# Altium PCB AVP32F069_EVM_Rev1.1_220623.PcbDoc (part 2 of 2)
Units mm, origin at the board's own origin, x right, y up, seen from the top; angles counter-clockwise.
Board outline 130.01 x 88 mm, 4 copper layers (Top Layer, GND, S1, Bottom Layer), stack 2.642 mm thick; 134 components, 131 nets, 561 pads, 238 vias.
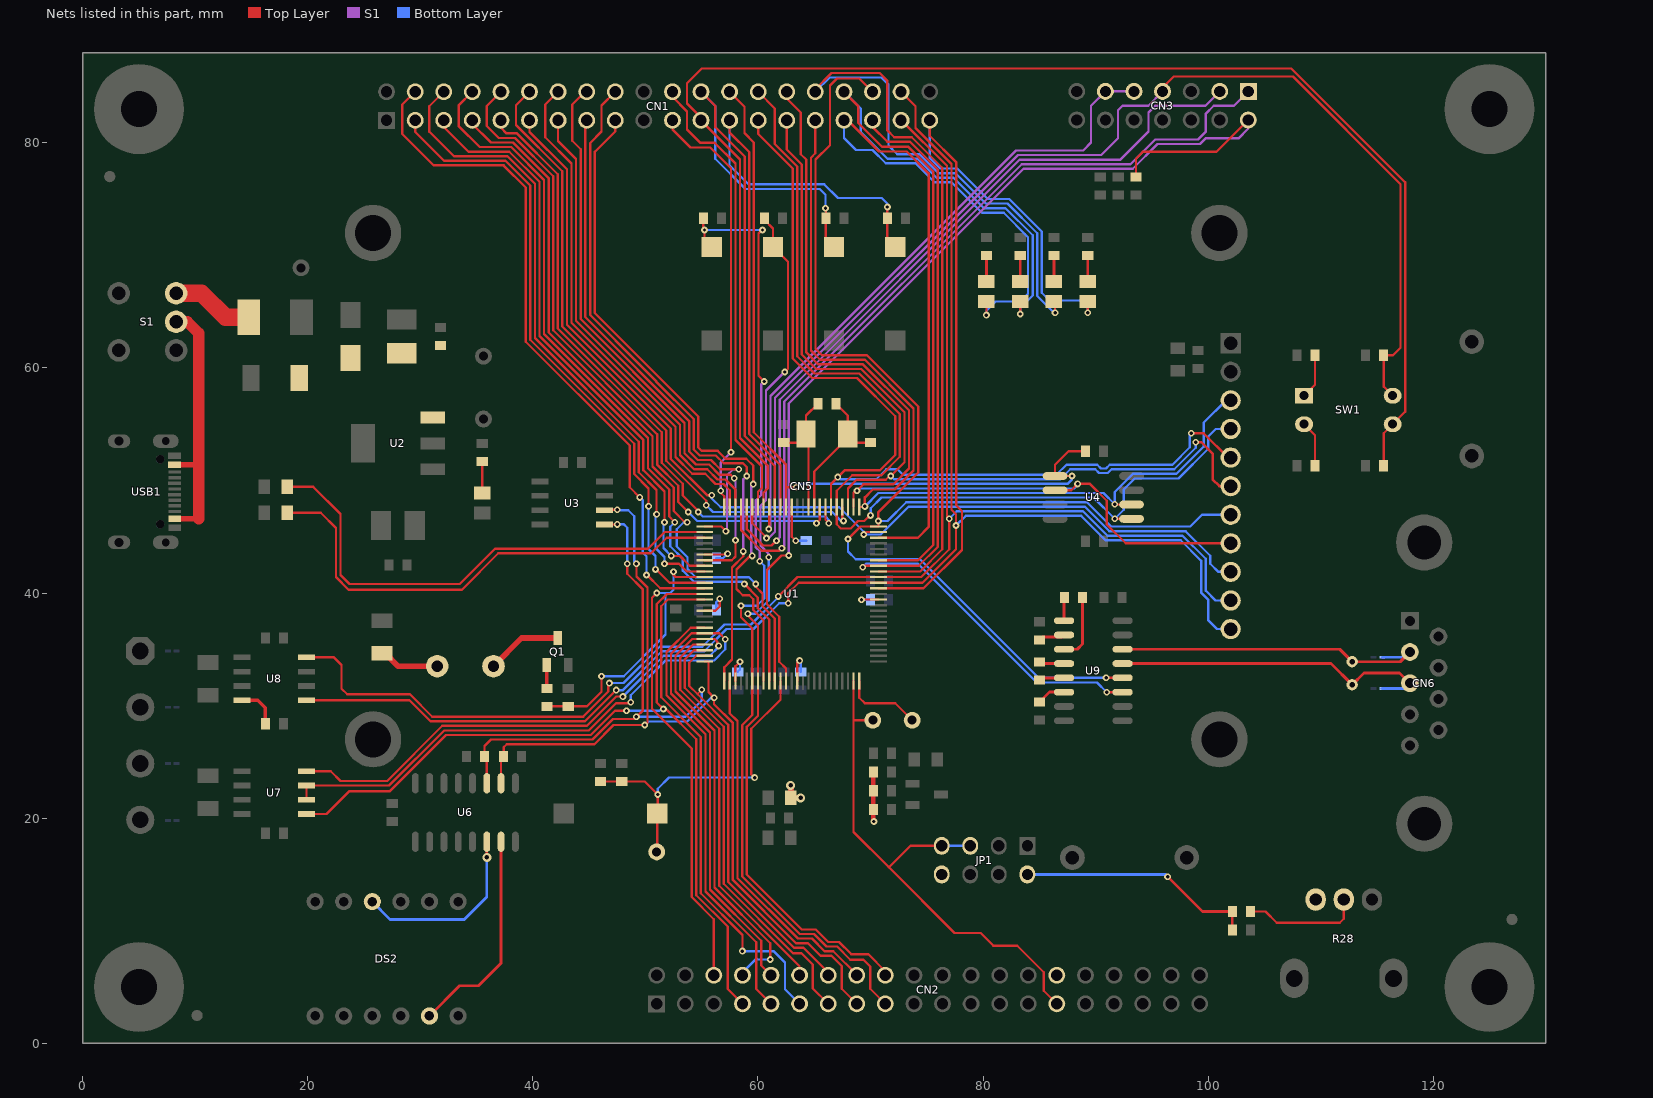
[diagram p4: the nets of this part, all layers, seen from the top]

## Via types
v1: diameter 0.6, hole 0.3, Top Layer to Bottom Layer, tented both sides, 170 vias
v2: diameter 0.8, hole 0.4, Top Layer to Bottom Layer, tented both sides, 64 vias
v3: diameter 1.27, hole 0.711, Top Layer to Bottom Layer, tented both sides, 4 vias

## Nets (pads, with @x,y where several pads share a name; then routed paths per layer and width w, separated by ;. In a path a pad name is that pad's centre, name@x,y a point inside that pad or via, vN(x,y) a via of type N, cw(c..) or ccw(c..) an arc to the next point about the centre after c; other vN are vias at no path point) (continued)
EPWM1A: CN1.4 U1.87 | length 61.7
  Top Layer w0.203: CN1.4@29.54,84.54 28.4,83.4 28.4,80.8 31.2,78 37.4,78 39.366,76.034 39.366,62.334 48.6,53.1 48.6,49.4 v1(49.503,48.497) ; v1(50.1,41.6) 50.148,41.6 51.319,40.429 55.258,40.429 U1.87@55.269,40.418
  Bottom Layer w0.203: v1(49.503,48.497) 49.753,48.247 49.753,43.608 50.1,43.261 v1(50.1,41.6)
EPWM1B: CN1.3 U1.86 | length 56.8
  Top Layer w0.203: CN1.3@29.54,82 29.54,80.96 32.094,78.406 37.568,78.406 39.772,76.202 39.772,62.502 49.006,53.268 49.006,50.575 50.281,49.3 v1(50.281,47.719) ; v1(50.9,42.1) 50.957,42.1 52.139,40.918 U1.86@55.269,40.918
  Bottom Layer w0.203: v1(50.281,47.719) 50.281,43.919 50.9,43.3 v1(50.9,42.1)
EPWM2A: CN1.6 U1.84 | length 57.8
  Top Layer w0.203: CN1.6@32.08,84.54 30.8,83.26 30.8,81 32.987,78.813 37.737,78.813 40.179,76.371 40.179,62.671 49.413,53.437 49.413,50.743 50.991,49.165 v1(50.991,47.009) ; v1(51.7,42.6) 52.984,42.6 53.666,41.918 U1.84@55.269,41.918
  Bottom Layer w0.203: v1(50.991,47.009) 50.9,46.919 50.9,44 51.7,43.2 v1(51.7,42.6)
EPWM2B: CN1.5 U1.83 | length 52.6
  Top Layer w0.203: CN1.5@32.08,82 32.08,81.42 34.281,79.219 37.905,79.219 40.585,76.539 40.585,62.839 49.819,53.605 49.819,50.912 51.7,49.031 v1(51.7,46.3) ; v1(52.3,43.3) 53.064,43.3 53.946,42.418 U1.83@55.269,42.418
  Bottom Layer w0.203: v1(51.7,46.3) 51.6,46.2 51.6,44 v1(52.3,43.3)
EPWM3A: CN1.8 U1.9 | length 68.8
  Top Layer w0.203: CN1.8@34.62,84.54 33.4,83.32 33.4,81.5 35.274,79.626 38.073,79.626 40.992,76.707 40.992,63.007 50.226,53.773 50.226,51.08 52.106,49.199 52.106,46.794 v1(52.6,46.3) ; v1(58.797,40.8) 59.987,39.61 59.987,38.658 60.994,37.652 U1.9@60.994,32.193
  Bottom Layer w0.203: v1(52.6,46.3) 52.2,45.9 52.2,44.148 53.328,43.019 53.328,41.972 54.306,40.994 58.603,40.994 v1(58.797,40.8)
EPWM3B: CN1.7 U1.10 | length 65.9
  Top Layer w0.203: CN1.7@34.62,82 34.62,81.68 36.268,80.032 38.242,80.032 41.398,76.876 41.398,63.176 50.632,53.942 50.632,51.248 52.513,49.367 52.513,47.287 53.5,46.3 v1(53.7,46.3) ; v1(59.8,40.8) 59.8,40.555 60.394,39.962 60.394,38.827 61.494,37.726 U1.10@61.494,32.193
  Bottom Layer w0.203: v1(53.7,46.3) 53.4,46.3 52.775,45.675 52.775,44.147 53.735,43.187 53.735,42.14 54.475,41.4 59.2,41.4 v1(59.8,40.8)
EPWM4A: CN1.10 U1.58 | length 59.5
  Top Layer w0.203: CN1.10@37.16,84.54 35.9,83.28 35.9,81.5 36.962,80.438 38.41,80.438 41.804,77.044 41.804,63.344 51.038,54.11 51.038,51.417 52.919,49.536 52.919,48.081 v1(53.8,47.2) ; v1(65.2,46.2) 65.494,46.494 U1.58@65.494,47.643
  Bottom Layer w0.203: v1(53.8,47.2) 54.606,46.394 65.006,46.394 v1(65.2,46.2)
EPWM4B: CN1.9 U1.57 | length 56.4
  Top Layer w0.203: CN1.9@37.16,82 37.16,81.34 37.655,80.845 38.578,80.845 42.211,77.212 42.211,63.512 51.445,54.278 51.445,51.585 53.326,49.704 53.326,48.674 54.7,47.3 v1(54.7,47.2) ; U1.57@65.994,47.643 65.994,46.506 v1(66.3,46.2)
  Bottom Layer w0.203: v1(54.7,47.2) 55.1,46.8 65.994,46.8 66.3,46.494 v1(66.3,46.2)
EPWM5A: CN1.12 U1.54 | length 58.3
  Top Layer w0.203: CN1.12@39.7,84.54 38.5,83.34 38.5,81.6 42.617,77.483 42.617,63.681 51.851,54.447 51.851,51.753 55.4,48.204 v1(55.4,47.8) ; U1.54@67.494,47.643 67.494,46.518 v1(67.6,46.412)
  Bottom Layer w0.203: v1(55.4,47.8) 55.994,47.206 66.594,47.206 67.388,46.412 v1(67.6,46.412)
EPWM5B/CS1: CN1.11 CN5.9 U1.49 | length 93.4
  Top Layer w0.203: CN1.11@39.7,82 39.7,80.975 43.024,77.651 43.024,63.849 52.258,54.615 52.258,51.922 55.479,48.7 v1(55.9,48.7) ; v1(69.4,45.2) 69.618,45.418 U1.49@70.719,45.418
  Bottom Layer w0.203: v1(55.9,48.7) 55.9,48.4 56.687,47.613 67.223,47.613 69.4,45.436 v1(69.4,45.2) 70.9,45.2 73.368,47.668 89.057,47.668 91.225,45.5 98,45.5 100.191,43.309 100.191,42.6 100.911,41.88 CN5.9@102,41.88
EPWM6A: CN1.14 U1.74 | length 45.3
  Top Layer w0.203: CN1.14@42.24,84.54 41.1,83.4 41.1,80.5 43.43,78.17 43.43,64.017 52.664,54.783 52.664,52.09 54.154,50.6 55.325,50.6 56.238,49.687 56.938,49.687 57.494,49.131 U1.74@57.494,47.643
EPWM6B: CN1.13 U1.73 | length 42
  Top Layer w0.203: CN1.13@42.24,82 42.24,80.16 43.836,78.564 43.836,64.186 53.07,54.952 53.07,52.258 54.322,51.006 55.494,51.006 56.406,50.094 57.106,50.094 57.994,49.206 U1.73@57.994,47.643
EPWM7A: CN1.16 U1.82 | length 52.1
  Top Layer w0.203: CN1.16@44.78,84.54 44.64,84.54 43.5,83.4 43.5,80.186 44.243,79.443 44.243,64.354 53.477,55.12 53.477,52.427 54.491,51.413 55.662,51.413 56.575,50.5 57.587,50.5 v1(57.887,50.2) ; U1.82@55.269,42.918 57.675,42.918 58,43.243 v1(58,44.7)
  S1 w0.203: v1(57.887,50.2) 58,50.087 v1(58,44.7)
EPWM7B: CN1.15 U1.76 | length 46.7
  Top Layer w0.203: CN1.15@44.78,82 44.649,81.869 44.649,64.522 53.883,55.288 53.883,52.595 54.659,51.819 55.83,51.819 56.649,51 v1(58.3,51) ; U1.76@55.269,45.918 56.732,45.918 v1(57.15,45.5)
  S1 w0.203: v1(57.15,45.5) 57.257,45.607 57.257,50.457 57.8,51 v1(58.3,51)
EPWM8A: CN1.18 U1.1 | length 61.7
  Top Layer w0.203: CN1.18@47.32,84.54 46.1,83.32 46.1,81 45.094,79.994 45.094,64.706 49.573,60.227 50.95,58.85 50.95,58.796 54.29,55.457 54.29,52.763 54.827,52.226 56.256,52.226 56.953,51.529 58.671,51.529 59,51.2 v1(59,50.4) ; U1.1@56.994,32.193 56.994,33.394 57.694,34.094 57.694,42.268 58.7,43.275 v1(58.7,43.7)
  S1 w0.203: v1(58.7,43.7) 58.7,50.1 v1(59,50.4)
EPWM8B: CN1.17 U1.8 | length 60.5
  Top Layer w0.203: CN1.17@47.32,82 47.32,81.02 45.5,79.2 45.5,64.875 54.696,55.679 54.696,52.932 54.996,52.632 56.424,52.632 57.121,51.935 58.965,51.935 59.592,51.308 59.588,51.304 v1(59.588,49.682) ; v1(59.5,43.3) 59.3,43.3 58.1,42.1 58.1,40.35 58.649,39.802 59.22,39.802 59.581,39.441 59.581,38.49 60.494,37.577 U1.8@60.494,32.193
  S1 w0.203: v1(59.5,43.3) 59.406,43.393 59.406,49.5 v1(59.588,49.682)
F: DS2.f U6.14 | length 16.6
  Top Layer w0.254: v2(35.905,16.505) U6.14@35.905,17.9
  Bottom Layer w0.254: DS2.f@25.73,12.58 27.31,11 33.9,11 35.905,13.005 v2(35.905,16.505)
G: DS2.g U6.15 | length 19.1
  Top Layer w0.254: DS2.g@30.81,2.42 33.49,5.1 35.175,5.1 37.175,7.1 U6.15@37.175,17.9
GPIO12/LED3: CN1.34 LD3.2 U1.44 | length 82.3
  Top Layer w0.203: CN1.34@67.64,84.54 68.9,83.28 68.9,81.788 71.044,79.644 73.384,79.644 75.57,77.458 75.57,44.27 75,43.7 74.218,42.918 U1.44@70.719,42.918 ; v1(83.3,64.8) LD3.2@83.3,65.925
  Bottom Layer w0.203: CN1.34@67.64,84.54 69.125,83.055 69.125,80.988 71.52,78.594 74.176,78.594 75.863,76.906 77.368,76.906 80.075,74.2 82,74.2 84.406,71.794 84.406,66.432 83.3,65.325 v1(83.3,64.8) v1@83.4,64.8
GPIO13: CN2.10 U1.95 U7.2 U7.3 | length 83.1
  Top Layer w0.203: U7.2@19.88,21.627 U7.3@19.88,22.897 27.223,22.897 32.119,27.794 44.968,27.794 47.387,30.213 48.7,30.213 v1(48.7,30.3) v1@48.9,30.3 ; v1(57.1,35.9) 56.582,36.418 U1.95@55.269,36.418 54.094,36.418 52.274,34.599 52.274,31.077 55.739,27.612 55.739,13.656 60.3,9.095 60.3,6.9 CN2.10@61.16,6.04
  Bottom Layer w0.203: v1(48.7,30.3) 48.7,30.925 51.786,34.012 56.112,34.012 57.1,35 v1(57.1,35.9)
GPIO14/SCITXDB: CN2.8 U1.96 U7.4 | length 80.7
  Top Layer w0.203: U7.4@19.88,24.167 22.033,24.167 22.896,23.304 27.054,23.304 31.951,28.2 44.8,28.2 47.4,30.8 v1(48,30.8) v1@48.1,30.9 ; v1(56.5,35.3) 56.382,35.418 56.382,35.7 56.164,35.918 U1.96@55.269,35.918 54.169,35.918 52.681,34.43 52.681,31.246 56.146,27.781 56.146,13.824 61.087,8.883 v1(61.087,7.442)
  Bottom Layer w0.203: v1(48,30.8) 51.618,34.418 55.718,34.418 56.5,35.2 v1(56.5,35.3) ; CN2.8@58.62,6.04 58.62,6.271 59.871,7.522 59.951,7.442 v1(61.087,7.442)
GPIO15/SCIRXDB: CN2.7 U1.88 U7.1 | length 79.1
  Top Layer w0.203: U7.1@19.88,20.357 21.657,20.357 23.7,22.4 27.3,22.4 32.287,27.387 45.137,27.387 47.299,29.55 v1(48.314,29.55) ; U1.88@55.269,39.918 51.918,39.918 50.994,38.994 50.994,30.306 v1(51.6,29.7) 51.825,29.7 54.52,27.005 54.52,13.151 57.308,10.363 57.308,4.812 CN2.7@58.62,3.5
  Bottom Layer w0.203: v1(48.314,29.55) 51.25,29.55 51.5,29.8 v1(51.6,29.7)
GPIO16/SPIA_SIMO: CN1.28 CN5.4 U1.55 U4.5 | length 93.7
  Top Layer w0.203: CN1.28@60.02,84.54 61.5,83.06 61.5,79.9 63.49,77.91 63.49,61.037 65.02,59.506 69.004,59.506 72.606,55.904 72.606,52.106 70.968,50.468 68.368,50.468 66.994,49.094 U1.55@66.994,47.643 66.994,46.106 67.356,45.744 68.244,45.744 68.9,46.4 69.451,46.4 69.951,46.9 v1(70,46.9) ; v1(91.7,46.6) 91.705,46.595 U4.5@93.2,46.595
  Bottom Layer w0.203: v1(70,46.9) 70.029,46.929 70.029,47.529 70.981,48.481 89.819,48.481 v1(91.7,46.6) 92.5,47.4 92.5,49.2 93.487,50.187 97.362,50.187 100.006,52.832 100.006,53.906 100.68,54.58 CN5.4@102,54.58
GPIO17/SPIA_SOMI: CN1.30 CN5.8 U1.52 U4.2 | length 86.7
  Top Layer w0.203: CN1.30@62.56,84.54 62.56,83.94 63.8,82.7 63.8,79 64.303,78.497 64.303,61.374 65.357,60.319 69.341,60.319 73.419,56.241 73.419,51.059 72.016,49.655 69.355,49.655 v1(68.8,49.1) 68.7,49.1 68.494,48.894 U1.52@68.494,47.643 ; U4.2@86.4,49.135 87.835,49.135 v1(88.4,49.7) 89.5,49.7 91,48.2 91,46.1 92.68,44.42 CN5.8@102,44.42
  Bottom Layer w0.203: v1(68.8,49.1) 68.994,49.294 88.094,49.294 88.5,49.7 v1(88.4,49.7)
GPIO18/SPIA_SCK: CN1.31 CN5.3 U1.51 U4.6 | length 84.6
  Top Layer w0.203: CN1.31@65.1,82 65.1,79.075 64.709,78.684 64.709,61.542 65.525,60.726 69.509,60.726 73.826,56.409 73.826,50.891 72.135,49.2 70.2,49.2 69.5,48.5 v1(69.5,47.7) 69.443,47.643 U1.51@68.994,47.643 ; v1(91.7,47.9) 91.735,47.865 U4.6@93.2,47.865
  Bottom Layer w0.203: v1(69.5,47.7) 70.687,48.887 90.713,48.887 v1(91.7,47.9) 91.7,48.975 93.319,50.594 97.194,50.594 99.6,53 99.6,55.125 101.595,57.12 CN5.3@102,57.12
GPIO19/SPIA_CSn: CN1.26 R14.2 U1.64 U4.1 | length 70.7
  Top Layer w0.203: CN1.26@57.48,84.54 58.8,83.22 58.8,80.872 59.632,80.04 59.632,54.292 62.494,51.43 62.494,49.4 ; U1.64@62.494,47.643 62.494,49.4 ; v1(63.4,49.4) 62.494,49.4 ; v1(87.9,50.4) 87.895,50.405 U4.1@86.4,50.405 86.4,51.4 87.6,52.6 R14.2@89.1,52.6
  Bottom Layer w0.203: v1(63.4,49.4) 63.7,49.7 87.5,49.7 87.9,50.1 v1(87.9,50.4)
GPIO20/KEY1: CN2.17 K1.1 R22.2 U1.6 | length 87.5
  Top Layer w0.203: R22.2@55.15,73.3 55.15,72.358 v1(55.245,72.263) 55.245,71.405 K1.1@55.9,70.75 ; v1(58.496,38.862) 58.496,37.846 59.494,36.848 U1.6@59.494,32.193 59.494,29.169 58.6,28.275 58.6,14.818 63.715,9.703 64.969,9.703 66.087,8.585 67.036,8.585 68.205,7.417 69.373,7.417 69.983,6.807 69.983,4.837 CN2.17@71.32,3.5 ; v1(60.401,72.263) 60.35,72.263 60.046,71.958 60.046,71.559 60.038,71.552 60.038,59.316 v1(60.554,58.801)
  S1 w0.203: v1(60.154,42.818) 60.154,43.707 59.813,44.048 59.813,48.238 60.303,48.729 60.303,58.551 v1(60.554,58.801)
  Bottom Layer w0.203: v1(55.245,72.263) v1(60.401,72.263) ; v1(58.496,38.862) 59.894,38.862 60.554,39.522 60.554,42.418 v1(60.154,42.818)
GPIO21/KEY2: CN2.18 K2.1 R24.2 U1.7 | length 78.7
  Top Layer w0.203: v1(59.106,38.151) 59.106,37.972 59.994,37.084 U1.7@59.994,32.193 59.994,29.094 59.006,28.106 59.006,14.986 63.884,10.109 65.138,10.109 66.247,9 67.197,9 68.301,7.895 69.825,7.895 71.32,6.4 CN2.18@71.32,6.04 ; R24.2@60.6,73.3 60.6,73.131 61.333,72.398 K2.1@61.333,70.75 61.371,70.75 62.677,69.444 62.677,59.934 v1(62.382,59.639)
  S1 w0.203: v1(60.96,43.18) 60.96,43.475 60.219,44.216 60.219,47.748 60.71,48.238 60.71,57.992 62.357,59.639 v1(62.382,59.639)
  Bottom Layer w0.203: v1(59.106,38.151) 59.758,38.151 60.96,39.353 v1(60.96,43.18)
GPIO22: CN2.13 U1.98 | length 38.4
  Top Layer w0.203: U1.98@55.269,34.918 54.318,34.918 53.494,34.094 53.494,31.582 56.958,28.117 56.958,14.161 63.118,8.001 63.861,8.001 64.877,6.985 64.877,4.863 CN2.13@66.24,3.5
GPIO23: CN2.16 U1.2 | length 32
  Top Layer w0.203: U1.2@57.494,32.193 57.494,29.306 58.178,28.622 58.178,14.666 63.547,9.296 64.801,9.296 65.919,8.179 66.697,8.179 68.78,6.095 CN2.16@68.78,6.04
GPIO24: CN2.12 U1.97 | length 35.3
  Top Layer w0.203: U1.97@55.269,35.418 54.243,35.418 53.087,34.262 53.087,31.414 56.552,27.949 56.552,13.992 63.7,6.844 CN2.12@63.7,6.04
GPIO25/LED1: CN1.39 LD1.2 U1.39 | length 75.8
  Top Layer w0.203: U1.39@70.719,40.418 74.718,40.418 78.129,43.829 78.129,47.271 77.606,47.794 77.606,78.296 75.26,80.642 CN1.39@75.26,82 ; v1(89.3,64.9) LD1.2@89.3,65.925
  Bottom Layer w0.203: CN1.39@75.26,82 75.26,78.659 76.2,77.719 77.705,77.719 80.411,75.013 82.337,75.013 85.219,72.13 85.219,66.681 85.9,66 88.8,66 89.3,65.5 v1(89.3,64.9)
GPIO26/USB0DP: R12.2 U1.78 | length 44.4
  Top Layer w0.203: R12.2@18.157,47.133 21.142,47.133 22.5,45.775 22.5,41.425 23.625,40.3 33.7,40.3 36.932,43.532 50.5,43.532 51.886,44.918 U1.78@55.269,44.918
GPIO27/USB0DN: R11.2 U1.77 | length 45.8
  Top Layer w0.203: R11.2@18.157,49.433 20.493,49.433 22.906,47.02 22.906,41.594 23.7,40.8 33.493,40.8 36.631,43.938 50.238,43.938 51.718,45.418 U1.77@55.269,45.418
GPIO28/SCIRXDA/BLK: CN1.36 CN5.7 U1.50 U9.12 | length 118.5
  Top Layer w0.203: v1(68,44.8) 69.118,45.918 U1.50@70.719,45.918 70.719,46.381 v1(70.7,46.4) 70.7,47.19 74.232,50.722 74.232,56.578 69.678,61.132 65.694,61.132 65.115,61.71 65.115,78.515 66.4,79.8 66.4,85.094 67.031,85.725 68.995,85.725 CN1.36@70.18,84.54 ; v1(90.935,32.465) U9.12@92.4,32.465
  Bottom Layer w0.203: v1(68,44.8) 68,43.7 68.694,43.006 74.394,43.006 84.935,32.465 v1(90.935,32.465) ; v1(70.7,46.4) 71.5,46.4 73.174,48.074 89.226,48.074 91.394,45.906 98.406,45.906 99.46,46.96 CN5.7@102,46.96
GPIO29/SCITXDA: CN1.35 U1.43 U9.11 | length 76.8
  Top Layer w0.203: v1(69.3,42.3) 69.418,42.418 U1.43@70.719,42.418 74.293,42.418 75.977,44.102 75.977,77.627 73.503,80.1 71.5,80.1 70.18,81.42 CN1.35@70.18,82 ; v1(90.995,31.195) U9.11@92.4,31.195
  Bottom Layer w0.203: v1(69.3,42.3) 69.6,42.6 74.225,42.6 84.767,32.059 90.131,32.059 v1(90.995,31.195)
GPIO30/CANRXA/CS2: CN1.37 CN5.10 U1.41 U8.4 | length 137.3
  Top Layer w0.203: U8.4@19.88,34.284 22.316,34.284 23,33.6 23,31.5 23.5,31 29.075,31 31.062,29.013 44.463,29.013 46.7,31.249 46.7,31.9 v1(46.8,32) ; v1(61.8,39.7) 63.518,41.418 74.518,41.418 77,43.9 v1(77,46.6) 76.789,46.811 76.789,77.963 72.753,82 CN1.37@72.72,82
  Bottom Layer w0.203: v1(46.8,32) 48.05,32 51.281,35.231 55.056,35.231 57.032,37.206 59.388,37.206 61.8,39.618 v1(61.8,39.7) v1@61.9,39.7 ; v1(77,46.6) 77.662,47.262 88.889,47.262 91.057,45.094 97.732,45.094 99.784,43.041 99.784,40.216 100.66,39.34 CN5.10@102,39.34
GPIO31/CANTXA/PEN: CN1.38 CN5.11 U1.40 U8.1 | length 139.7
  Top Layer w0.203: U8.1@19.88,30.474 29.026,30.474 30.894,28.606 44.632,28.606 v1(47.4,31.375) ; v1(62.7,39.1) 62.7,40 63.618,40.918 74.618,40.918 77.6,43.9 v1(77.6,46) 77.6,47 77.2,47.4 77.2,78.127 74,81.327 74,83.26 CN1.38@72.72,84.54
  Bottom Layer w0.203: v1(47.4,31.375) 48,31.375 51.45,34.824 55.224,34.824 57.2,36.8 59.6,36.8 61.9,39.1 v1(62.7,39.1) ; v1(77.6,46) 78.455,46.855 88.721,46.855 90.889,44.687 97.563,44.687 99.378,42.873 99.378,40.047 100,39.425 100,37.595 100.795,36.8 CN5.11@102,36.8
GPIO32/IIC_SDA: CN2.14 R17.1 U1.99 U3.5 U6.3 | length 80.6
  Top Layer w0.203: U6.3@35.905,23.1 35.905,25.271 R17.1@35.7,25.476 35.7,26.4 36.281,26.981 45.305,26.981 47.124,28.8 49,28.8 v1(49.2,29) 49.774,29.574 49.774,40.326 48.394,41.706 v1(48.394,42.606) ; U3.5@46.357,46.095 47.495,46.095 v1(47.5,46.1) ; v1(55,31.4) 54.651,31.051 54.651,31 ; U1.99@55.269,34.418 54.518,34.418 53.9,33.8 53.9,31.751 54.651,31 ; CN2.14@66.24,6.04 66.24,6.283 64.039,8.484 63.21,8.484 57.365,14.329 57.365,28.286 54.651,31
  Bottom Layer w0.203: v1(47.5,46.1) 48.094,46.1 48.394,45.8 v1(48.394,42.606) ; v1(49.2,29) 53.552,29 55,30.448 v1(55,31.4)
GPIO33/IIC_SCL: CN2.15 R16.1 U1.100 U3.6 U6.2 | length 83.3
  Top Layer w0.203: U6.2@37.175,23.1 37.175,25.251 R16.1@37.4,25.476 37.4,26.3 37.674,26.574 45.473,26.574 47.174,28.275 47.178,28.271 v1(49.946,28.271) 50.181,28.506 50.181,40.494 49.2,41.475 v1(49.2,42.6) ; U3.6@46.357,47.365 46.392,47.4 v1(47.5,47.4) ; U1.100@55.269,33.918 55.6,33.918 55.6,31.2 v1(56.1,30.7) 56.1,30.125 57.771,28.454 57.771,14.497 63.379,8.89 64.445,8.89 65.563,7.772 66.528,7.772 67.443,6.858 67.443,4.837 CN2.15@68.78,3.5
  Bottom Layer w0.203: v1(47.5,47.4) 47.535,47.365 48.465,47.365 49,46.83 49,42.8 v1(49.2,42.6) ; v1(49.946,28.271) 50.268,28.594 53.72,28.594 55.826,30.7 v1(56.1,30.7)
GPIO34: CN1.23 R4.1 SW1.3 U1.68 | length 135.3
  Top Layer w0.203: U1.68@60.494,47.643 60.494,48.919 60.858,49.284 60.858,51.342 58.413,53.787 58.413,78.527 CN1.23@54.94,82 54.94,82.26 53.7,83.5 53.7,85.3 55.008,86.608 107.392,86.608 117.505,76.495 117.505,56.105 SW1.3@116.4,55 115.6,54.2 R4.1@115.6,51.3
GPIO39/KEY3: CN1.24 K3.1 R26.2 U1.66 | length 62
  Top Layer w0.203: CN1.24@54.94,84.54 56.2,83.28 56.2,81.4 58.819,78.781 58.819,53.956 61.494,51.281 U1.66@61.494,47.643 ; v1(66,74.2) 66.05,74.15 R26.2@66.05,73.3 ; R26.2@66.036,72.9 66.036,71.164 K3.1@66.7,70.5
  Bottom Layer w0.203: CN1.24@54.94,84.54 56.2,83.28 56.2,78.6 58.894,75.906 65.494,75.906 66,75.4 v1(66,74.2)
GPIO44/RES: CN1.27 CN5.5 U1.56 | length 84.8
  Top Layer w0.203: CN1.27@60.02,82 60.02,80.78 63.083,77.717 63.083,60.833 64.816,59.1 68.8,59.1 72.2,55.7 72.2,52.275 70.825,50.9 67.7,50.9 v1(67.1,50.3) 66.494,49.694 U1.56@66.494,47.643 ; v1(98.5,54.2) 99.6,54.2 101.76,52.04 CN5.5@102,52.04
  Bottom Layer w0.203: v1(67.1,50.3) 67.294,50.106 70.506,50.106 71.4,51 72.4,51 72.887,50.513 86.513,50.513 87.406,51.406 90.146,51.406 90.481,51.071 90.919,51.071 91.254,51.406 96.832,51.406 98.371,52.946 98.371,54.071 v1(98.5,54.2)
GPIO50/LED2: CN1.32 LD2.2 U1.42 | length 96.6
  Top Layer w0.203: CN1.32@65.1,84.54 65.1,84.76 66.542,86.202 70.821,86.202 71.476,85.547 71.476,81.15 72.119,80.506 73.672,80.506 76.383,77.795 76.383,43.883 74.418,41.918 U1.42@70.719,41.918 ; LD2.2@86.3,65.925 86.4,65.825 v1(86.4,64.9)
  Bottom Layer w0.203: CN1.32@65.1,84.54 66.377,85.817 70.977,85.817 71.6,85.194 71.6,79.77 72.37,79 74.344,79 76.032,77.313 77.537,77.313 80.243,74.606 82.168,74.606 84.813,71.962 84.813,66.387 86.3,64.9 v1(86.4,64.9)
GPIO51/LED4: CN1.33 LD4.2 U1.48 | length 78.3
  Top Layer w0.203: CN1.33@67.64,82 68,82 70.762,79.238 73.216,79.238 75.164,77.29 75.164,48.364 75.164,45.864 74.218,44.918 U1.48@70.719,44.918 ; v1(80.3,64.7) LD4.2@80.3,65.925
  Bottom Layer w0.203: CN1.33@67.64,82 67.64,80.43 68.7,79.37 70.169,79.37 71.352,78.187 74.008,78.187 75.695,76.5 77.2,76.5 79.906,73.794 81.832,73.794 84,71.625 84,66.6 83.3,65.9 81.1,65.9 80.3,65.1 v1(80.3,64.7)
GPIO52/DC: CN1.29 CN5.6 U1.53 | length 80
  Top Layer w0.203: CN1.29@62.56,82 62.56,79.415 63.896,78.079 63.896,61.205 65.189,59.913 69.173,59.913 73.013,56.073 73.013,51.613 v1(71.8,50.4) 71.8,50.5 71.362,50.062 68.762,50.062 67.994,49.294 U1.53@67.994,47.643 ; v1(98.9,53.4) 99.4,53.4 100.4,52.4 100.4,50.1 101,49.5 CN5.6@102,49.5
  Bottom Layer w0.203: v1(71.8,50.4) 72.094,50.106 86.859,50.106 87.752,51 89.978,51 90.313,50.665 91.087,50.665 91.422,51 97,51 98.9,52.9 v1(98.9,53.4)
GPIO53/KEY4: CN1.25 K4.1 R29.2 U1.65 | length 59.8
  Top Layer w0.203: CN1.25@57.48,82 57.48,80.925 59.226,79.179 59.226,54.124 61.994,51.355 U1.65@61.994,47.643 ; v1(71.5,74.3) R29.2@71.5,73.3 71.5,71.45 K4.1@72.2,70.75
  Bottom Layer w0.203: CN1.25@57.48,82 57.48,78.02 59.187,76.313 65.887,76.313 67.1,75.1 71,75.1 71.5,74.6 v1(71.5,74.3)
GPIO54/KEY2: CN1.22 U1.69 | length 41.1
  Top Layer w0.203: CN1.22@52.4,84.54 52.4,84.1 53.7,82.8 53.7,81.2 54.9,80 56.169,80 58.006,78.163 58.006,53.594 60.35,51.25 60.35,49.35 59.994,48.994 U1.69@59.994,47.643
GPIO55/KEY1: CN1.21 U1.75 | length 38
  Top Layer w0.203: CN1.21@52.4,82 52.4,81.2 54.006,79.594 55.757,79.594 57.6,77.751 v1(57.6,52.5) ; v1(56.7,49.1) 56.7,48.9 56.994,48.606 U1.75@56.994,47.643
  S1 w0.203: v1(56.7,49.1) 56.7,51.6 v1(57.6,52.5)
GPIO56/EN_BUZZER: CN2.6 R23.2 R25.1 U1.85 | length 60.4
  Top Layer w0.203: R23.2@41.25,29.934 R25.1@43.15,29.934 44.81,29.934 46.1,31.224 v1(46.1,32.6) ; v1(51,40) 50.587,39.587 50.587,29.713 54.114,26.186 54.114,12.982 56.08,11.016 CN2.6@56.08,6.04 ; v1(52.5,41.9) 52.5,41.6 52.682,41.418 U1.85@55.269,41.418
  Bottom Layer w0.203: v1(46.1,32.6) 48.076,32.6 51.788,36.312 51.788,40 ; v1(51,40) 52.2,40 52.5,40.3 v1(52.5,41.9)
GPIO57: CN2.11 U1.89 | length 46.2
  Top Layer w0.203: U1.89@55.269,39.418 51.993,39.418 51.4,38.825 51.4,30.737 54.926,27.211 54.926,13.319 58.62,9.625 v1(58.62,8.182)
  Bottom Layer w0.203: v1(58.62,8.182) 61.389,8.182 62.408,7.163 62.408,4.792 CN2.11@63.7,3.5
GPIO58: CN2.9 U1.94 | length 39.4
  Top Layer w0.203: U1.94@55.269,36.918 54.018,36.918 51.868,34.768 51.868,30.909 55.333,27.444 55.333,13.487 59.842,8.978 59.842,4.818 CN2.9@61.16,3.5
NetC2_1: C2.1 R9.1 U1.59 X1.2 | length 13.5
  Top Layer w0.203: U1.59@64.994,47.643 64.994,50.794 67.975,53.775 X1.2@67.975,54.149 ; R9.1@66.925,56.822 67.975,55.772 X1.2@67.975,54.149 ; C2.1@70.318,53.355 68.769,53.355 X1.2@67.975,54.149
NetC3_2: C3.2 R9.2 U1.60 X1.1 | length 12.3
  Top Layer w0.203: C3.2@61.961,53.355 63.481,53.355 X1.1@64.275,54.149 ; U1.60@64.494,47.643 64.494,53.931 X1.1@64.275,54.149 ; R9.2@65.325,56.822 64.275,55.772 X1.1@64.275,54.149
NetC6_1: C6.1 C7.1 D1.2 D2.2 U2.3
NetC8_2: C8.2 U1.81 | length 3.2
  Top Layer w0.203: U1.81@55.269,43.418 57.218,43.418 v1(57.3,43.5)
  Bottom Layer w0.203: C8.2@56.3,43.1 56.9,43.1 v1(57.3,43.5)
NetC9_2: C9.2 U1.37 | length 2.3
  Top Layer w0.203: v1(69.2,39.4) 69.218,39.418 U1.37@70.719,39.418
  Bottom Layer w0.203: v1(69.2,39.4) C9.2@70,39.4
NetC10_2: C10.2 U1.63 | length 4.1
  Top Layer w0.203: U1.63@62.994,47.643 62.994,45.004 v1(63.349,44.649)
  Bottom Layer w0.203: v1(63.349,44.649) C10.2@64.281,44.649
NetC11_2: C11.2 U1.14 | length 2.9
  Top Layer w0.203: U1.14@63.494,32.193 63.494,33.794 v1(63.7,34)
  Bottom Layer w0.203: v1(63.7,34) 63.8,33.9 C11.2@63.8,33
NetC13_2: C13.2 U1.91 | length 3.3
  Top Layer w0.203: U1.91@55.269,38.418 56.218,38.418 56.6,38.8 v1(56.6,39.5)
  Bottom Layer w0.203: C13.2@56.3,38.5 56.3,39.2 v1(56.6,39.5)
NetC14_2: C14.2 U1.3 | length 2.9
  Top Layer w0.203: U1.3@57.994,32.193 57.994,33.494 v1(58.4,33.9)
  Bottom Layer w0.203: C14.2@58.2,33 58.4,33.2 v1(58.4,33.9)
NetC18_1: C18.1 JP1.2 R27.2 | length 21.3
  Top Layer w0.254: v1(96.4,14.8) 99.5,11.7 R27.2@102.15,11.7 C18.1@102.15,10.049 ; R27.2@102.167,11.745 R27.2@102.212,11.7
  Bottom Layer w0.254: JP1.2@83.94,15 96.2,15 v1(96.4,14.8)
NetC27_1: C27.1 U9.1 | length 2.1
  Top Layer w0.254: U9.1@87.2,37.545 87.2,39.549 C27.1@87.251,39.6
NetC27_2: C27.2 U9.3 | length 6
  Top Layer w0.254: U9.3@87.2,35.005 88.376,35.005 88.851,35.48 C27.2@88.851,39.6
NetC28_1: C28.1 U9.4 | length 2.2
  Top Layer w0.254: C28.1@85.019,33.877 85.161,33.735 U9.4@87.2,33.735
NetC28_2: C28.2 U9.5 | length 2.3
  Top Layer w0.254: C28.2@85.019,32.277 85.207,32.465 U9.5@87.2,32.465
NetDS1_1: DS1.1 R13.2 | length 2.8
  Top Layer w0.203: DS1.1@35.5,48.875 R13.2@35.5,51.7
NetF1_1: F1.1 S1.3 | length 7.3
  Top Layer w1.524: S1.3@8.3,66.64 10.56,66.64 12.7,64.5 F1.1@14.75,64.5
NetLD1_1: LD1.1 R15.1 | length 2.3
  Top Layer w0.254: LD1.1@89.3,67.675 R15.1@89.3,70
NetLD2_1: LD2.1 R18.1 | length 2.3
  Top Layer w0.254: LD2.1@86.3,67.675 R18.1@86.3,70
NetLD3_1: LD3.1 R19.1 | length 2.3
  Top Layer w0.254: LD3.1@83.3,67.675 R19.1@83.3,70
NetLD4_1: LD4.1 R20.1 | length 2.3
  Top Layer w0.254: LD4.1@80.3,67.675 R20.1@80.3,70
NetQ1_D: Q1.D U5.2 | length 6.7
  Top Layer w0.508: U5.2@36.5,33.5 39,36 Q1.D@42.2,36
NetQ1_G: Q1.G R23.1 | length 2.1
  Top Layer w0.305: R23.1@41.25,31.534 Q1.G@41.25,33.6
NetR1_2: R1.2 SW1.1 | length 4
  Top Layer w0.203: SW1.1@108.53,57.54 109.5,58.51 R1.2@109.5,61.137
NetR3_2: R3.2 SW1.2 | length 4.1
  Top Layer w0.203: SW1.2@108.53,55 109.5,54.03 R3.2@109.5,51.3
NetR21_2: R21.2 U5.1 | length 5.4
  Top Layer w0.508: R21.2@26.6,34.65 26.875,34.65 28.025,33.5 U5.1@31.5,33.5
NetR27_1: R27.1 R28.2 | length 10.6
  Top Layer w0.203: R27.1@103.75,11.7 105.1,11.7 106.1,10.7 111.7,10.7 112.057,11.057 R28.2@112.057,12.766
NetR32_2: R32.2 U8.8 | length 3.8
  Top Layer w0.305: U8.8@14.165,30.474 15.546,30.474 16.222,29.798 R32.2@16.222,28.379
RESET: C1.1 K5.1 R6.2 TP1.1 U1.11 | length 30
  Top Layer w0.203: R6.2@46,23.25 C1.1@47.9,23.25 49.95,23.25 v1(51.1,22.1) 51.1,20.45 K5.1@51.05,20.4 51.05,17.05 TP1.1@51,17 ; v1(59.7,23.6) 59.413,23.887 59.413,27.938 61.994,30.519 U1.11@61.994,32.193
  Bottom Layer w0.203: v1(51.1,22.1) 51.1,22.6 52.1,23.6 v1(59.7,23.6)
RS232_1_RX: CN6.3 pad.4@112.8,31.853 T5.1 U9.13 | length 29.8
  Top Layer w0.254: U9.13@92.4,33.735 110.918,33.735 pad.4@112.8,31.853 113.847,32.9 117.019,32.9 CN6.3@117.93,31.989
  Bottom Layer w0.254: T5.1@115.462,31.527 117.468,31.527 CN6.3@117.93,31.989
RS232_1_TX: CN6.2 pad.4@112.8,33.9 T6.1 U9.14 | length 29
  Top Layer w0.254: U9.14@92.4,35.005 111.695,35.005 pad.4@112.8,33.9 117.068,33.9 CN6.2@117.93,34.762
  Bottom Layer w0.203: T6.1@115.462,34.3 117.468,34.3 CN6.2@117.93,34.762
TCK: CN3.9 CN3.11 U1.67 | length 59.3
  Top Layer w0.203: v1(60.96,45.695) 60.994,45.729 U1.67@60.994,47.643
  S1 w0.203: v1(60.96,45.695) 61.033,45.695 61.116,45.778 61.116,57.515 82.927,79.326 88.9,79.326 89.6,80.026 89.6,83.305 CN3.11@90.872,84.576 CN3.9@93.412,84.576
TDI: CN3.3 U1.71 | length 69.5
  Top Layer w0.203: U1.71@58.994,47.643 58.994,45.681 60.453,44.221 61.214,44.221 v1(61.646,44.653)
  S1 w0.203: v1(61.646,44.653) 61.929,44.936 61.929,57.178 83.263,78.513 92.213,78.513 94.7,81 94.7,82.7 95.3,83.3 99.755,83.3 CN3.3@101.032,84.576
TDO: CN3.7 R2.1 SW1.4 U1.70 | length 109.5
  Top Layer w0.203: U1.70@59.494,47.643 59.494,46.206 v1@60.833,44.867 ; v1(60.757,44.882) v1@60.818,44.882 ; CN3.7@95.952,84.576 95.952,84.889 96.956,85.894 107.532,85.894 117.098,76.327 117.098,61.798 116.437,61.137 R2.1@115.597,61.137 115.597,58.343 SW1.4@116.4,57.54
  S1 w0.203: v1(60.757,44.882) 60.96,44.882 61.523,45.444 61.523,57.347 83.095,78.919 90.5,78.919 92,80.419 92,82.9 92.4,83.3 94.675,83.3 CN3.7@95.952,84.576
TMS: CN3.1 U1.72 | length 73.2
  Top Layer w0.203: U1.72@58.494,47.643 58.494,45.606 60.336,43.764 61.92,43.764 v1(62.128,43.972)
  S1 w0.203: v1(62.128,43.972) 62.335,44.179 62.335,57.01 83.432,78.106 93.106,78.106 95.3,80.3 99.1,80.3 99.8,81 99.8,82.6 100.5,83.3 102.295,83.3 CN3.1@103.572,84.576
TRST: CN3.2 R5.2 U1.12 | length 91.3
  Top Layer w0.203: U1.12@62.494,32.193 62.494,33.306 61.9,33.9 61.9,37.895 60.8,38.995 60.8,42.055 62.081,43.336 v1(62.742,43.336) ; R5.2@93.6,76.95 93.6,78.6 94.203,79.203 100.738,79.203 CN3.2@103.572,82.036
  S1 w0.203: v1(62.742,43.336) 62.742,56.842 83.6,77.7 93.3,77.7 95.494,79.894 99.268,79.894 99.775,80.4 102.7,80.4 103.572,81.272 CN3.2@103.572,82.036
V+: C24.1 U9.2 | length 2.4
  Top Layer w0.254: C24.1@85.019,35.849 85.27,36.1 87.025,36.1 U9.2@87.2,36.275
V-: C25.1 U9.6 | length 2.5
  Top Layer w0.254: C25.1@85.019,30.305 85.909,31.195 U9.6@87.2,31.195
VDDA: C23.2 C34.1 CN2.30 JP1.8 L1.1 R28.3 R33.1 TP3.1 U1.25 | length 13.4
  Top Layer w0.203: U1.25@68.994,32.193 68.994,30.706 69.5,30.2 72.2,30.2 TP3.1@73.7,28.7
  Top Layer w0.381: C23.2@70.251,24.1 C34.1@70.251,22.433 R33.1@70.251,20.767 70.251,19.749 v1(70.3,19.7)
  Top Layer w0.508: v2(62.9,22.9) 62.932,22.868 L1.1@62.932,21.8 v2(63.8,21.8)
VIN+: S1.2 USB1.A4B9 USB1.A9B4 | length 23.3
  Top Layer w0.5: USB1.A9B4@8,46.6 10.3,46.6 ; USB1.A4B9@8.2,51.4 10.3,51.4
  Top Layer w1: S1.2@8.3,64.1 9.3,64.1 10.3,63.1 10.3,51.4 10.3,46.6
VREF_HI: CN2.29 JP1.5 JP1.7 TP2.1 U1.24 | length 48.5
  Top Layer w0.203: U1.24@68.494,32.193 68.494,28.7 ; TP2.1@70.2,28.7 68.494,28.7 ; JP1.7@76.32,17.54 73.547,17.54 71.633,15.626 ; CN2.29@86.56,3.5 85.4,4.66 85.4,6.3 83.039,8.661 80.918,8.661 79.792,9.787 77.471,9.787 71.633,15.626 ; 68.494,28.7 68.494,18.764 71.633,15.626
  Bottom Layer w0.203: JP1.7@76.32,17.54 JP1.5@78.86,17.54
pads on no net: CN1.19 CN1.20 CN1.40 CN2.5 CN2.19 CN2.20 CN3.6 CN5.0 CN6.0 CN6.1 CN6.4 CN6.6 CN6.7 CN6.8 CN6.9 H1.1 H2.0 H3.1 H4.0 H5.1 H6.0 H7.1 H8.0 M1.0 M2.0 M3.0 R28.0 S1.0 S1.1 U1.45 U8.5 U9.7 U9.8 U9.9 U9.10 USB1. USB1.A5 USB1.A8 USB1.B5 USB1.B8

## Polygon pours and split planes (outlines as drawn)
DGND on Top Layer "DGND" (solid, remove dead copper, pour order 44): -0.394,88 130.013,88 130.013,-0.025 -0.279,-0.025 -0.305,-0.051
AGND on Top Layer "VDDA" (solid, remove dead copper, pour order 26): 72.624,6.576 62.128,17.072 62.128,23.165 62.128,29.032 69.696,36.6 75.438,36.6 88.111,23.927 105.969,23.927 105.994,23.952 105.994,14.249 119.888,14.249 119.964,14.326 119.964,-0.051 72.624,-0.051
NetC6_1 on Top Layer "Top Layer-No Net" (solid, pour order 40): 18.3,62 32.6,62 32.6,54.5 29.3,54.5 27.3,56.5 18.3,56.5
DVDD3V3 on Top Layer "VDDA" (solid, remove dead copper, pour order 30): 48.768,38.354 45.136,38.354 45.136,36.084 45.618,35.601 45.618,35.306 48.768,35.306
VDDA on Top Layer "VDDA" (solid, remove dead copper, pour order 22): 60.198,19.177 63.119,19.177 63.119,15.113 62.611,14.605 60.325,14.605 60.198,14.732
DVDD3V3 on Top Layer "Top Layer-No Net" (solid, remove dead copper, pour order 42): 22.3,56.1 22.3,47.2 23.5,46 23.5,41.8 24.1,41.2 27.9,41.2 27.9,52.1 32.1,52.1 32.1,54.1 29.2,54.1 27.2,56.1
DVDD3V3 on Top Layer "VDDA" (solid, remove dead copper, pour order 24): 56.515,19.304 59.563,19.304 59.563,16.129 59.436,16.002 56.896,16.002 56.515,16.383
DGND on Bottom Layer "DGND" (solid, remove dead copper, pour order 50): -0.394,88 130.013,88 130.013,-0.025 -0.279,-0.025 -0.305,-0.051
AGND on Bottom Layer "VDDA" (solid, remove dead copper, pour order 48): 72.624,6.576 62.128,17.072 62.128,23.165 62.128,29.032 69.696,36.6 75.438,36.6 88.111,23.927 105.969,23.927 105.994,23.952 105.994,14.249 119.888,14.249 119.964,14.326 119.964,-0.051 72.624,-0.051
DVDD3V3 on S1 "DGND" (solid, remove dead copper, pour order 54): -0.394,88 130.013,88 130.013,-0.025 -0.279,-0.025 -0.305,-0.051
VDDA on S1 "AGND" (solid, remove dead copper, pour order 52): 72.624,6.576 62.128,17.072 62.128,20.955 62.15,23.1 62.128,23.165 62.128,29.032 69.696,36.6 75.438,36.6 88.111,23.927 105.969,23.927 105.994,23.952 105.994,14.249 119.888,14.249 119.964,14.326 119.964,-0.051 72.624,-0.051
AGND on GND (split plane): 87.992,23.746 88.045,23.705 88.081,23.69 88.107,23.679 88.173,23.671 105.763,23.671 105.763,14.224 105.772,14.158 105.798,14.096 105.838,14.043 105.892,14.002 105.953,13.977 106.02,13.968 119.784,13.968 119.784,0.51 73.395,0.51 73.395,5.161 73.386,5.228 73.361,5.289 73.32,5.342 62.406,16.256 62.406,19.068 62.417,19.082 62.442,19.143 62.451,19.21 62.442,19.276 62.417,19.338 62.406,19.352 62.406,23.165 62.406,29.249 67.978,34.822 67.996,34.844 68.018,34.874 68.044,34.935 68.052,35 68.052,36.9 68.052,38.166 73.572,38.166
DGND on GND (split plane): 129.503,0.51 120.297,0.51 120.297,14.224 120.288,14.29 120.262,14.352 120.222,14.405 120.168,14.446 120.107,14.471 120.04,14.48 106.276,14.48 106.276,23.851 106.267,23.917 106.241,23.979 106.201,24.032 106.158,24.065 106.125,24.108 106.071,24.149 106.01,24.174 105.943,24.183 88.279,24.183 73.863,38.599 73.81,38.64 73.748,38.665 73.682,38.674 73.651,38.67 67.8,38.67 67.735,38.662 67.674,38.636 67.622,38.596 67.582,38.544 67.556,38.483 67.548,38.418 67.548,36.9 67.548,35.104 61.993,29.55 61.969,29.531 61.928,29.478 61.902,29.416 61.894,29.35 61.894,23.165 61.894,16.15 61.902,16.084 61.928,16.022 61.969,15.969 72.883,5.055 72.883,0.51 0.51,0.51 0.51,87.49 129.503,87.49

## Keep-outs
Keep-Out Layer:
  lines w0.203: 0,0 120,0 130.013,0 130.013,28.563 130.013,46.437 130.013,88 0,88 0,0

## Other copper
Top Layer:
  pour cut-out: 74.595,56.578 74.801,56.578 74.8,56.576 74.8,55.9 74.7,55.9 74.595,56.005 74.595,56.578
  text "Advchip" at 10.236,82.266 h2.54
GND (plane layer: these items are gaps in the copper):
  lines w0.381: 120.04,-0.127 120.091,-0.178
  lines w0.5: 62.15,29.35 67.8,35 67.8,36.9 67.8,38.418 73.682,38.418
  lines w0.508: 62.15,29.35 62.15,23.165 62.15,16.15 73.139,5.161 73.139,-0.279 ; 62.169,19.235 62.195,19.21 ; 73.682,38.418 88.173,23.927 105.943,23.927 ; 106.02,23.851 106.02,14.224 120.04,14.224 120.04,-0.127

## Silkscreen, mask and mechanical layers (free items; w line width, h text height)
Top Overlay:
  circle w0.254: c101,72 r2.5
  circle w0.254: c25.8,27 r2.5
  circle w0.254: c101,27 r2.5
  circle w0.3: c46.458,58.183 r2.5
  circle w0.4: c20.252,29.35 r0.2
  circle w0.762: c12.827,16.256 r0.381
  lines w0.15: 25.73,80.767 25.73,79.37 76.556,79.37 76.556,80.767 ; 25.73,85.695 25.73,87.574 ; 25.756,87.574 76.53,87.574 76.556,87.549 76.556,85.644 ; 27,79.396 27,81.707 ; 39.7,79.421 39.7,81.402 ; 48.581,79.472 48.581,87.574 ; 49.739,0.508 49.739,2.388 ; 49.739,7.315 49.739,8.839 100.564,8.839 100.564,7.315 ; 49.764,0.508 100.539,0.508 ; 51.009,6.375 51.009,8.814 ; 51.146,79.472 51.146,87.574 ; 63.709,6.68 63.709,8.839 ; 65.113,79.396 65.113,81.758 ; 72.624,0.533 72.624,8.763 ; 75.139,0.508 75.139,8.839 ; 75.235,79.446 75.235,81.809 ; 76.409,6.68 76.409,8.712 ; 89.122,6.325 89.122,8.839 ; 94.539,0.508 94.564,0.533 ; 99.243,6.274 99.243,8.839 ; 100.564,0.533 100.564,2.438
  lines w0.152: 35.608,56.912 35.608,59.63 ; 110.02,62.932 115.113,62.932 ; 110.401,62.538 110.02,62.919 110.401,63.3 ; 114.745,62.564 115.126,62.945 114.745,63.326
  lines w0.2: 107.963,65.005 107.963,70.39 116.99,70.39 116.99,64 107.963,64 107.963,65.284 ; 107.963,67.265 116.99,67.265 ; 110.376,64.04 110.376,70.39
  lines w0.254: 28.08,73.026 ccw(c25.8,72) 28.085,73.015 ; 111.505,15.553 cw(c111.481,17.353) 112.388,15.798 ; 112.461,16.595 112.37,15.778 113.234,15.778
  lines w0.3: 45.111,60.24 47.956,56.253
  text "NC" at 49.064,86.33 h0.9
  text "24" at 51.881,86.33 h0.9
  text "2" at 26.797,86.279 h0.9
  text "12" at 39.091,86.279 h0.9
  text "EPWM" at 42.824,86.279 h0.9
  text "32" at 64.465,86.279 h0.9
  text "40" at 74.549,86.279 h0.9
  text "EPWM" at 31.42,86.254 h0.9
  text "1" at 103.121,84.246 h1
  text "JTAG" at 110.7,82.6 h2
  text "2" at 103.019,81.732 h1
  text "NC" at 49.114,79.599 h0.9
  text "1" at 26.772,78.126 h0.9
  text "11" at 39.218,78.126 h0.9
  text "23" at 51.881,78.126 h0.9
  text "31" at 64.465,78.126 h0.9
  text "39" at 74.549,78.126 h0.9
  text "BOOT" at 108.1,71.2 h1.5
  text "1" at 108.9,68.2 h1.2
  text "TDO" at 111.913,68.2 h1.2
  text "AVP32F069_EVM" at 27.1,67.1 h2.2
  text "2" at 108.7,65.2 h1.2
  text "GPIO34" at 110.913,65.1 h1.2
  text "Rev1.1  22/06/24" at 33.2,64.4 h1.52
  text "1" at 108.6,62.3 h1.2
  text "0" at 116,62.3 h1.2
  text "DGND" at 125.3,59.1 h1.2 r270
  text "Pb" at 44.806,57.048 h2.54
  text "1" at 89.2,55.7 h3
  text "TFT" at 104.3,51.5 h1.8 r270
  text "PWR" at 33.909,43.536 h1.2
  text "EEPROM" at 40.64,43.536 h1.2
  text "FLASH" at 87.6,42.4 h1.2
  text "USB-C" at 1.6,41.4 h1.5
  text "L" at 11.641,35.471 h1.2 r90
  text "RS232" at 113.7,35.3 h1.5 r270
  text "CAN" at 21.2,33.5 h1 r270
  text "H" at 11.692,28.689 h1.2 r90
  text "A" at 11.564,25.304 h1.2 r90
  text "RS485" at 21.2,24.3 h1 r270
  text "POT" at 109.678,19.893 h1.5
  text "7" at 76,19.3 h1.2
  text "5" at 78.548,19.3 h1.2
  text "3" at 81.095,19.3 h1.2
  text "1" at 83.643,19.3 h1.2
  text "B" at 11.764,18.504 h1.2 r90
  text "+" at 110.719,16.616 h1.8
  text "RESET" at 42.57,16.027 h1.5
  text "DISPLAY" at 15.713,15.3 h1.8
  text "AGND" at 91.3,13.5 h1
  text "8" at 76,12 h1.2
  text "6" at 78.567,12 h1.2
  text "4" at 81.133,12 h1.2
  text "2" at 83.7,12 h1.2
  text "2" at 50.729,9.296 h0.9
  text "12" at 63.048,9.296 h0.9
  text "22" at 75.748,9.296 h0.9
  text "32" at 88.423,9.296 h0.9
  text "40" at 98.507,9.296 h0.9
  text "NC" at 73.234,7.595 h0.9
  text "1" at 50.831,0.813 h0.9
  text "11" at 63.226,0.813 h0.9
  text "NC" at 73.132,0.813 h0.9
  text "21" at 75.875,0.813 h0.9
  text "ADC" at 81.667,0.813 h0.9
  text "31" at 88.499,0.813 h0.9
  text "ADC" at 91.928,0.813 h0.9
  text "39" at 98.634,0.813 h0.9
Bottom Overlay:
  circle w0.2: c68.098,55.465 r1.25
  region: 82.485,71.002 46.519,71.002 46.519,66.1 82.485,66.1
  text "Read EVM User Guide before use." at 82.136,72.348 h1.52
  text "S/N" at 89.496,67.395 h2.54
  text "www.advancechip.com" at 81.662,60.697 h1.52
  text "Contact:0731-88731029" at 81.662,57.751 h1.52
  text "Powered by" at 81.662,54.957 h1.52
  text "Advancechip Co.,LTD" at 66.346,54.855 h1.52
  text "C" at 68.632,54.754 h1.52
  text "N" at 27.73,45.843 h5
  text "-0" at 21.145,44.842 h4
  text "V" at 22.739,44.798 h4
  text "94" at 20.999,39.442 h4
  text "R" at 29.33,39.341 h2
Top Solder:
  rectangle: 9.855,80.92 23.546,85.619
Drill Drawing:
  text ".Legend" at 114.813,-7.7 h5.08

## Dimensions
0,0 to 0,88 on Top Overlay
0,0 to 130.013,0 on Top Overlay

## Text inside footprints (layer, text, board x,y; h text height)
CN5: Top Overlay "11" at 98.901,36.14 h1.2; Top Overlay "1" at 99.781,61.743 h1.2
CN6: Top Overlay "9" at 120.033,26.01 h1 r270; Top Overlay "5" at 117.467,25.222 h1 r270; Top Overlay "1" at 117.467,39.395 h1 r270; Top Overlay "6" at 119.982,39.116 h1 r270
DS2: Top Overlay "b" at 34.326,12.079 h1.52; Top Overlay "a" at 24.217,12.282 h1.52; Top Overlay "G1" at 22.362,11.799 h1.52 r90; Top Overlay "G2" at 30.008,11.723 h1.52 r90; Top Overlay "G3" at 32.573,11.698 h1.52 r90; Top Overlay "c" at 29.17,2.071 h1.52; Top Overlay "d" at 24.064,2.046 h1.52; Top Overlay "e" at 21.448,2.096 h1.52; Top Overlay "f" at 26.731,12.104 h1.52; Top Overlay "g" at 31.659,2.122 h1.52; Top Overlay "p" at 26.655,2.198 h1.52; Top Overlay "G4" at 35.393,1.563 h1.52 r90
SW1: Top Overlay "1" at 107.948,56.548 h1.2 r270; Top Overlay "2" at 107.973,54.11 h1.2 r270